# Altium PCB FMC_Test_Module.PcbDoc (part 1 of 2)
Units mm, origin at the board's own origin, x right, y up, seen from the top; angles counter-clockwise.
Board outline 34.9 x 69 mm, 4 copper layers (Top Layer, Int1 (GND), Int2 (PWR), Bottom Layer), stack 1.508 mm thick; 11 components, 88 nets, 527 pads, 220 vias.
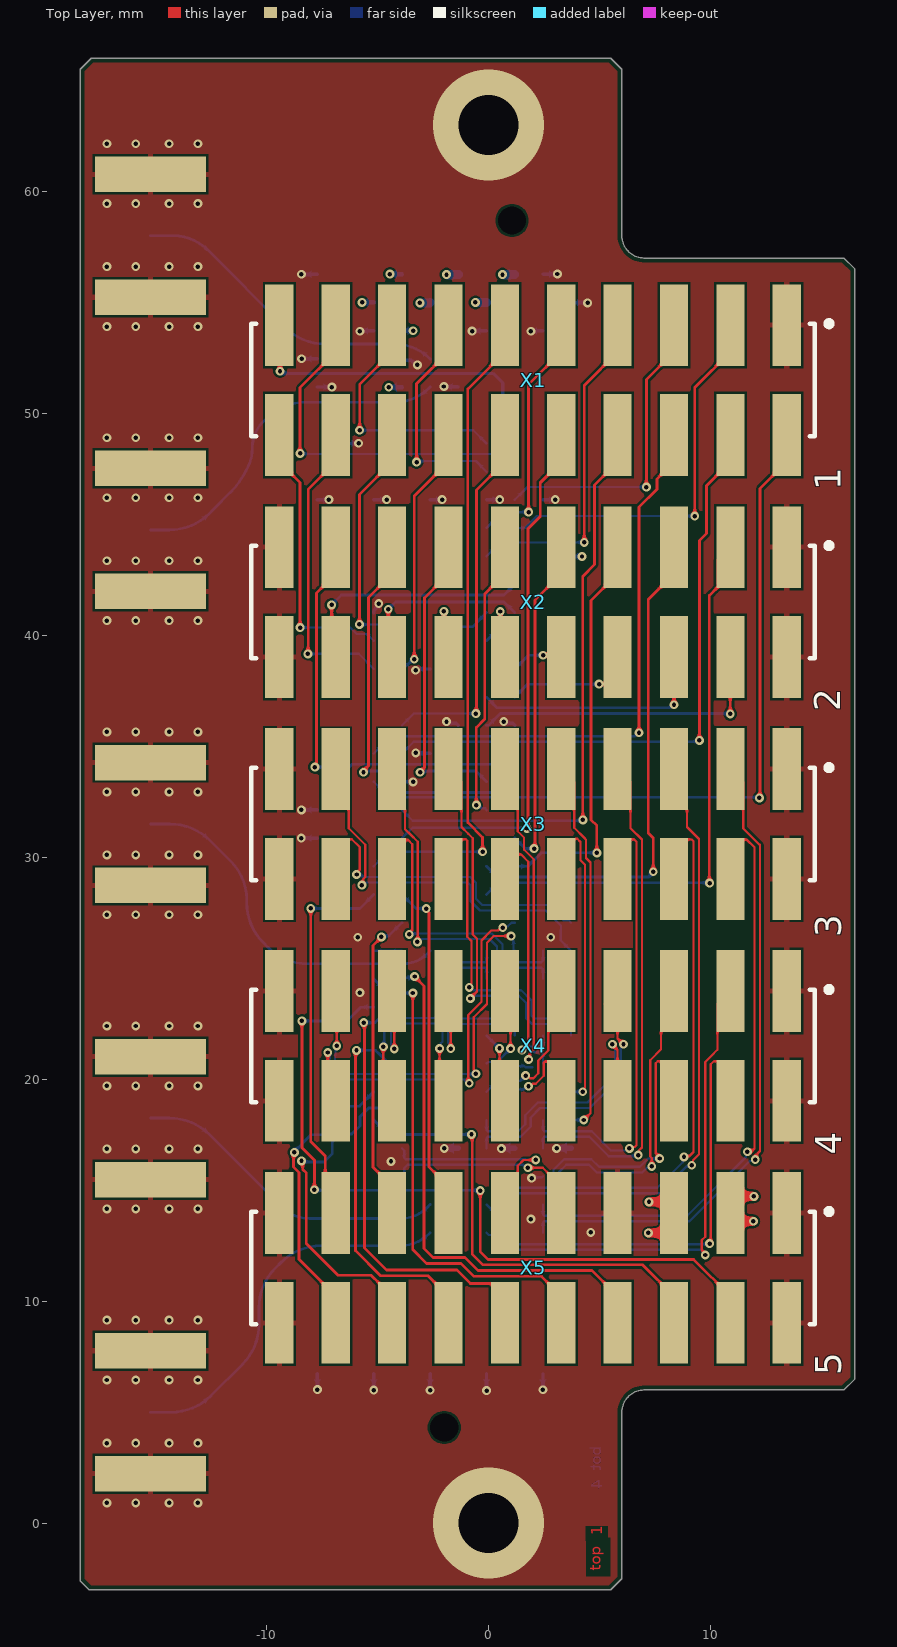
[diagram p0: Top Layer view]
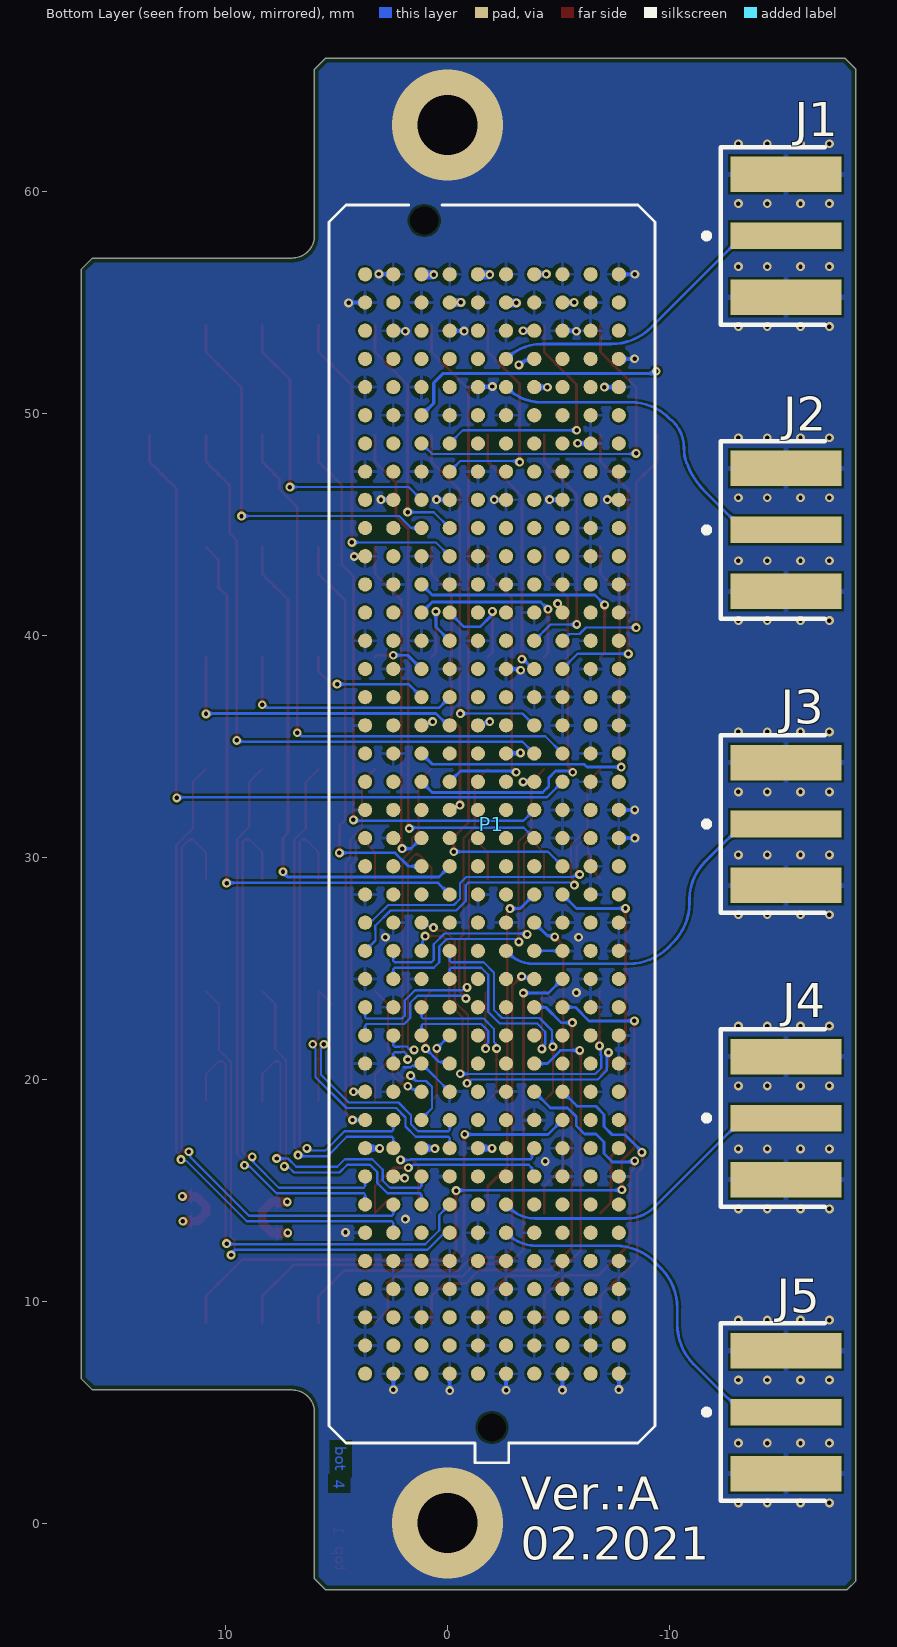
[diagram p1: Bottom Layer view, seen from below]
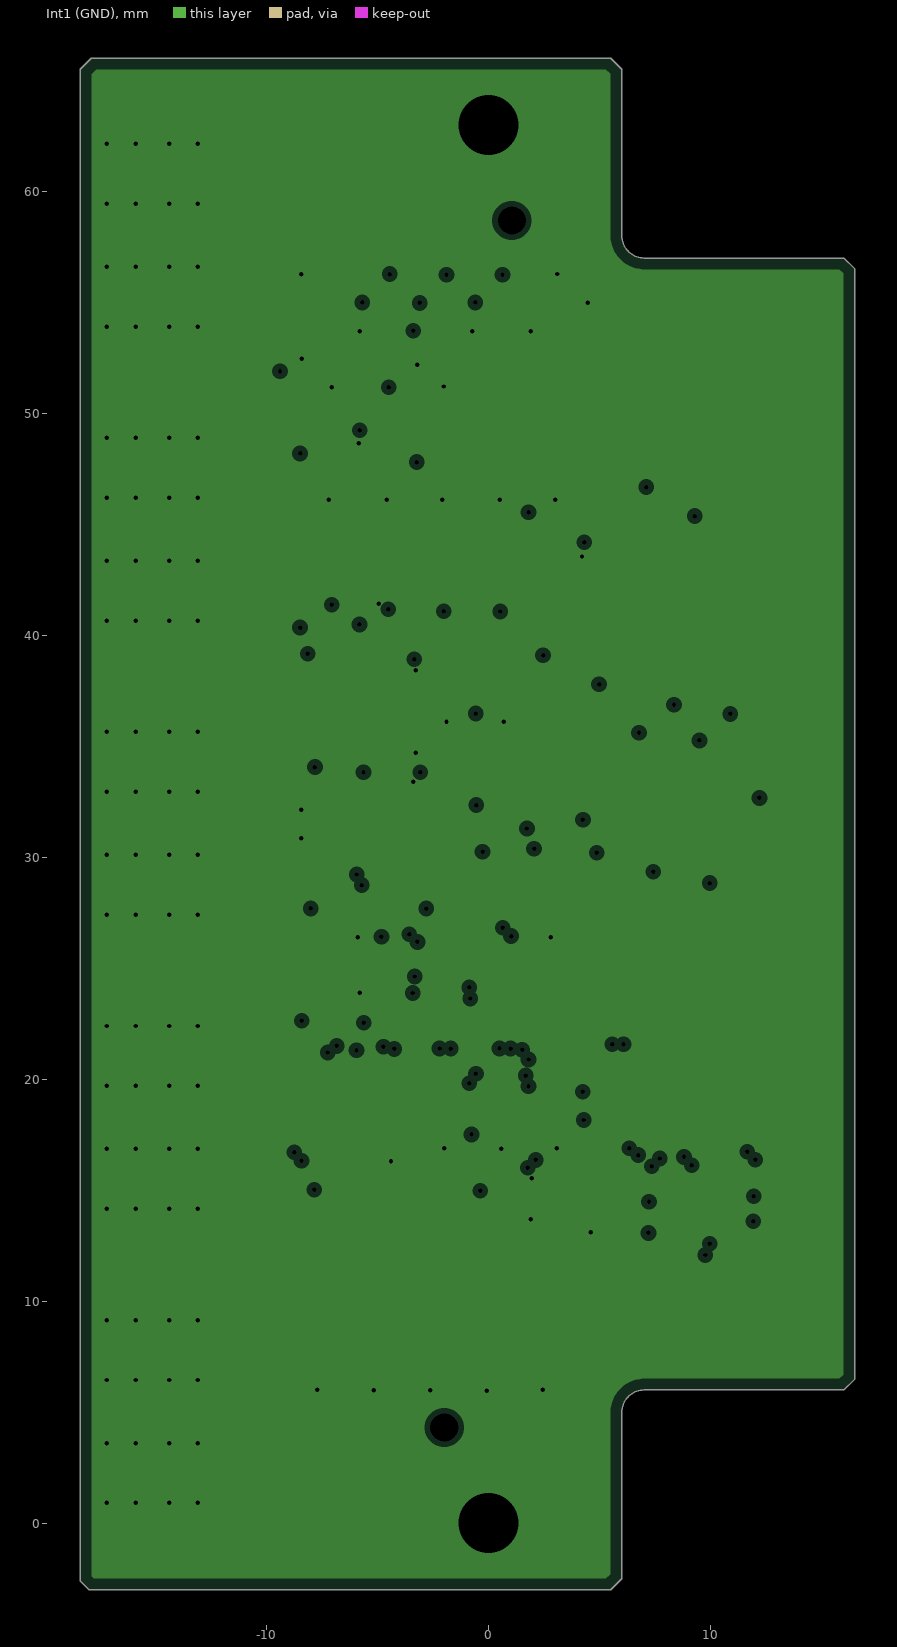
[diagram p2: Int1 (GND), clearances drawn from the general rule]
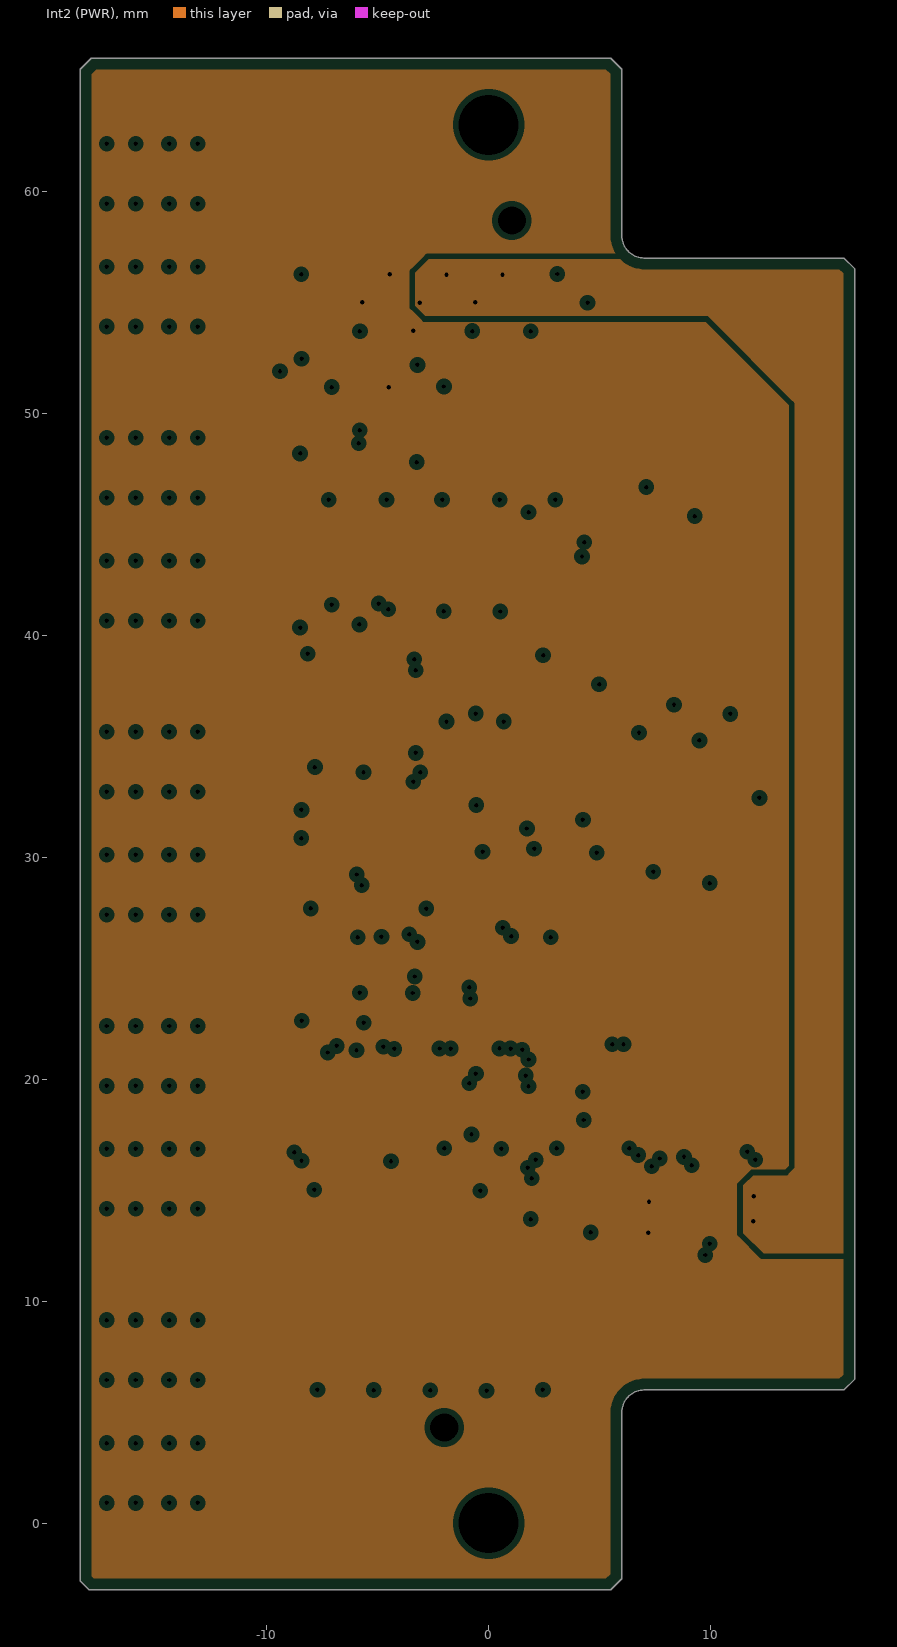
[diagram p3: Int2 (PWR), clearances drawn from the general rule]
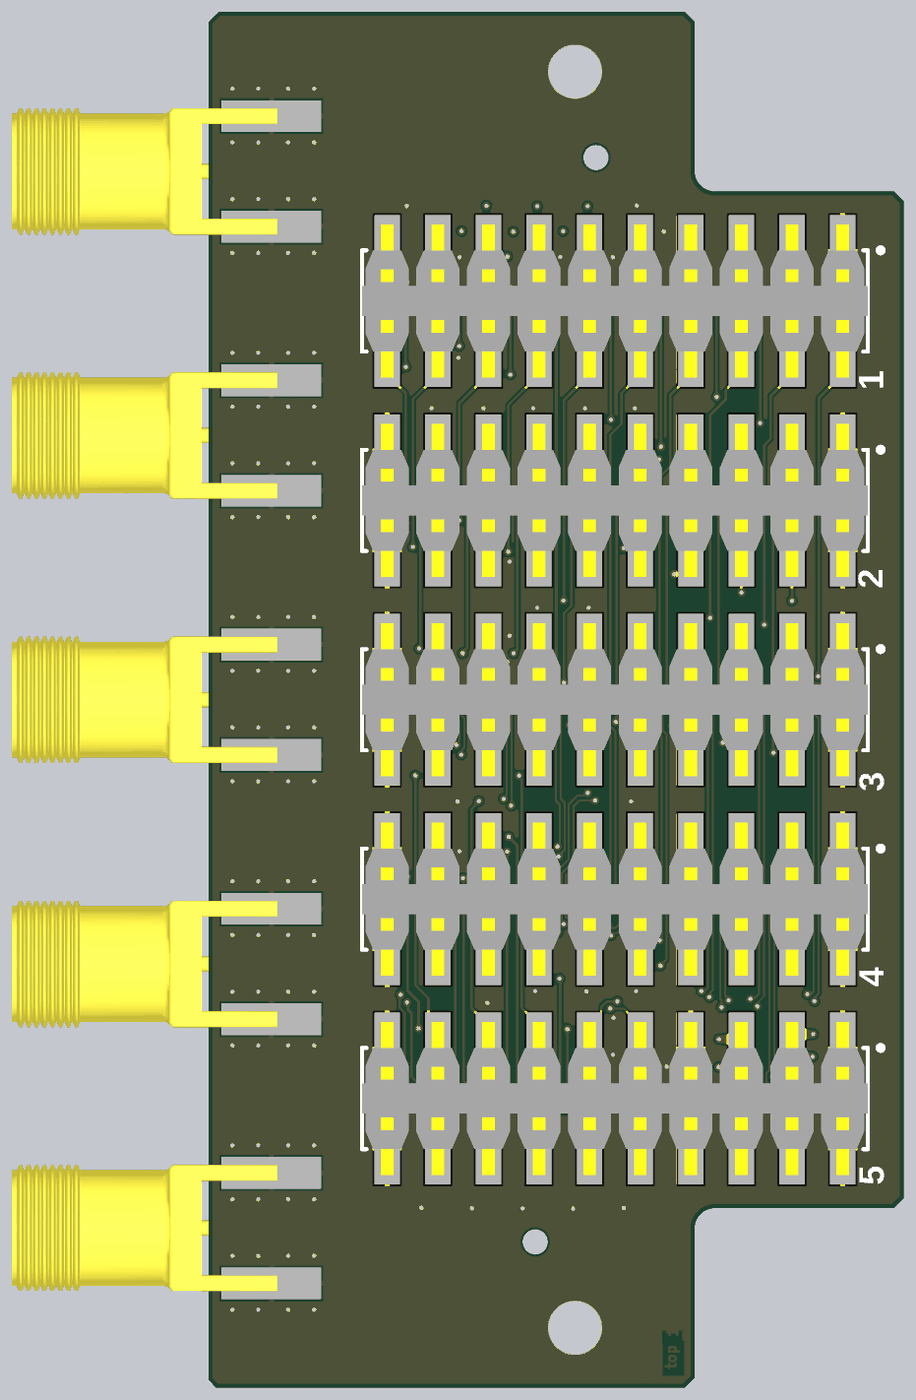
[diagram p5: 3D render of the assembled board from above, using the file's embedded part models]
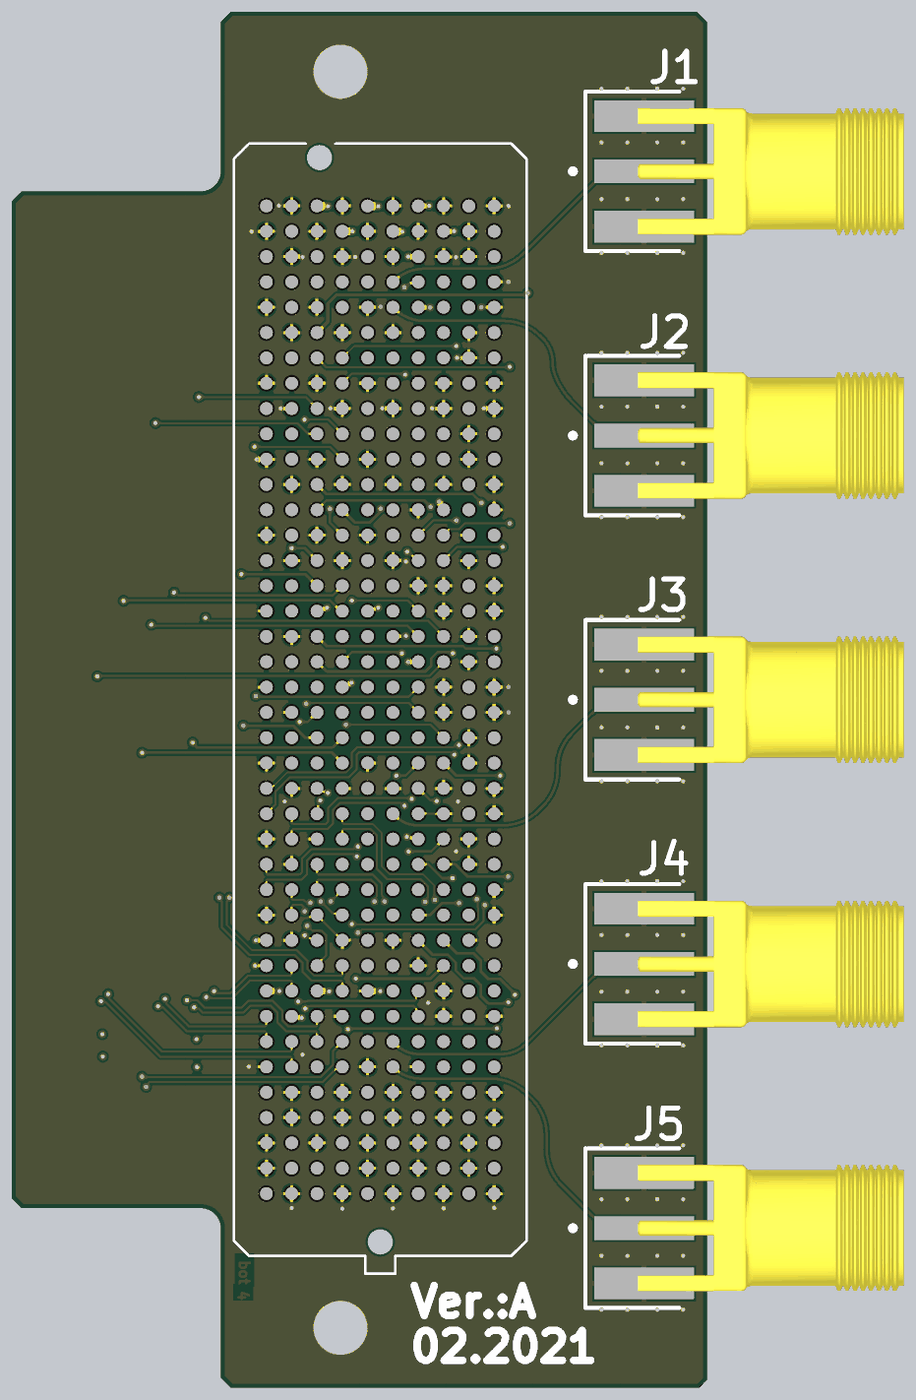
[diagram p6: 3D render of the assembled board from below, using the file's embedded part models]

## Layer stack, top to bottom
Top Solder: solder mask 0.0254, SM-001, Dk 4
Top Layer: signal copper 0.035
Dielectric 2: prepreg 0.0838, PP-009, Dk 4
Int1 (GND): plane copper 0.035, net GND
Dielectric 3: core 1.2, Core-043, Dk 4.3
Int2 (PWR): plane copper 0.035, net (Multiple Nets)
Dielectric 4: prepreg 0.0838, PP-009, Dk 4
Bottom Layer: signal copper 0.035
Bottom Solder: solder mask 0.0254, SM-001, Dk 4

## Board outline
-18.4,-2.6 -18.4,65.5 -17.9,66 5.5,66 6,65.5 6,58 ccw(c7,58) 7,57 16,57 16.5,56.5 16.5,6.5 16,6 7,6 ccw(c7,5) 6,5 6,-2.5 5.5,-3 -18,-3

## Design rules (kind name [scope] priority, off if disabled: settings)
BoardOutlineClearance [All] p1: gap=0.2 ignorepadtopadclearanceinfootprint=FALSE
Clearance [All] p1: gap=0.1 ignorepadtopadclearanceinfootprint=FALSE
DiffPairsRouting DiffPairsRouting_Hyper [InDifferentialPair('HYPER_CK')] p1: maxlimit=0.15 minlimit=0.15 mostfreqgap=0.15 toplayer_minwidth=0.1 toplayer_maxwidth=0.1 toplayer_prefwidth=0.1 bottomlayer_minwidth=0.1 bottomlayer_maxwidth=0.1 bottomlayer_prefwidth=0.1 impedanceprofiledriven=TRUE impedanceprofileid={B9DEDC51-EA28-49EF-AFAD-D0C3E7C7F371} impedanceprofilevalue=100.000000 maxuncoupledlength=12.7
DiffPairsRouting DiffPairsRouting_MPP_D [InDifferentialPairClass('All Differential Pairs')] p2: maxlimit=0.15 minlimit=0.15 mostfreqgap=0.15 toplayer_minwidth=0.1 toplayer_maxwidth=0.1 toplayer_prefwidth=0.1 bottomlayer_minwidth=0.1 bottomlayer_maxwidth=0.1 bottomlayer_prefwidth=0.1 impedanceprofiledriven=TRUE impedanceprofileid={B9DEDC51-EA28-49EF-AFAD-D0C3E7C7F371} impedanceprofilevalue=100.000000 maxuncoupledlength=12.7
DiffPairsRouting [InDifferentialPair('No Differential Pair')] p3: maxlimit=0.15 minlimit=0.15 mostfreqgap=0.15 toplayer_minwidth=0.1 toplayer_maxwidth=0.1 toplayer_prefwidth=0.1 bottomlayer_minwidth=0.1 bottomlayer_maxwidth=0.1 bottomlayer_prefwidth=0.1 impedanceprofiledriven=TRUE impedanceprofileid={B9DEDC51-EA28-49EF-AFAD-D0C3E7C7F371} impedanceprofilevalue=100.000000 maxuncoupledlength=12.7
HoleSize [All] p1: absolutevalues=TRUE maxlimit=4 minlimit=0.025 maxpercent=80.000 minpercent=20.000
MinimumSolderMaskSliver [All] p1: minsoldermaskwidth=0.1
PlaneClearance [All] p1: clearance=0.254
PlaneConnect [All] p1: pad.planeconnectstyle=Relief pad.reliefexpansion=0.125 pad.reliefentries=4 pad.reliefconductorwidth=0.125 pad.reliefairgap=0.125 via.planeconnectstyle=Direct via.reliefexpansion=0.508 via.reliefentries=4 via.reliefconductorwidth=0.254 via.reliefairgap=0.254
PolygonConnect PolygonConnect_GND_FMC [HasFootprint('BTB-SM1-27-2V400F')] p1: connectstyle=Relief reliefconductorwidth=0.15 reliefentries=4 polygonreliefangle="90 Angle" airgapwidth=0.2
PolygonConnect PolygonConnect_GND_FMC_1 [HasFootprint('BTB-SM1-27-2V400M')] p2: connectstyle=Relief reliefconductorwidth=0.15 reliefentries=4 polygonreliefangle="90 Angle" airgapwidth=0.2
PolygonConnect PolygonConnect_GND_FMC_2 [HasFootprint('FBGA24_A-130')] p3: connectstyle=Relief reliefconductorwidth=0.15 reliefentries=4 polygonreliefangle="90 Angle" airgapwidth=0.2
PolygonConnect PolygonConnect_GND [InNet('GND')] p4: thpad.connectstyle=Relief thpad.reliefconductorwidth=1 thpad.reliefentries=4 thpad.polygonreliefangle="90 Angle" thpad.airgapwidth=0.1 smdpad.connectstyle=Relief smdpad.reliefconductorwidth=0.254 smdpad.reliefentries=4 smdpad.polygonreliefangle="90 Angle" smdpad.airgapwidth=0.1 via.connectstyle=Direct via.reliefconductorwidth=0.254 via.reliefentries=4 via.polygonreliefangle="90 Angle" via.airgapwidth=0.254
PolygonConnect [All] p5: connectstyle=Relief reliefconductorwidth=0.254 reliefentries=4 polygonreliefangle="90 Angle" airgapwidth=0.254
RoutingVias [All] p1: holewidth=0.2 width=0.4 viastyle="Through Hole" minholewidth=0.2 minwidth=0.4 maxholewidth=3 maxwidth=6
SilkToSilkClearance [All] p1: silktosilkclearance=0.15
SilkToSolderMaskClearance [IsPad] p1: minsilkscreentomaskgap=0 clearancetoexposedcopper=TRUE
SolderMaskExpansion [All] p1: expansion=0.102 istentingtop=FALSE
Width Width_50R_CON1 [InNetClass('S_FMC_MPP_CON1')] p1: maxlimit=0.125 minlimit=0.125 preferedwidth=0.125 impedanceprofiledriven=TRUE impedanceprofileid={FCD363CF-F7B2-4878-A8FD-48319899D079} impedanceprofilevalue=50.000000 minimp=50.000000 maximp=50.000000 favimp=50.000000
Width Width_50R_CON2 [InNetClass('S_FMC_MPP_CON2')] p2: maxlimit=0.125 minlimit=0.125 preferedwidth=0.125 impedanceprofiledriven=TRUE impedanceprofileid={FCD363CF-F7B2-4878-A8FD-48319899D079} impedanceprofilevalue=50.000000 minimp=50.000000 maximp=50.000000 favimp=50.000000
Width [All] p3: maxlimit=5 minlimit=0.1 preferedwidth=0.15
23 further rules are at their usual default settings.

## Classes and differential pairs
component class FMC: P1
net class DP_FMC_MPP_CON2: CON2_GP_D_N0 CON2_GP_D_N1 CON2_GP_D_N2 CON2_GP_D_N3 CON2_GP_D_N4 CON2_GP_D_N5 CON2_GP_D_N6 CON2_GP_D_N7 CON2_GP_D_P0 CON2_GP_D_P1 CON2_GP_D_P2 CON2_GP_D_P3 CON2_GP_D_P4 CON2_GP_D_P5 CON2_GP_D_P6 CON2_GP_D_P7
net class DP_FMC_MPP_CON1: CON1_GP_D_N0 CON1_GP_D_N1 CON1_GP_D_N2 CON1_GP_D_N3 CON1_GP_D_N4 CON1_GP_D_N5 CON1_GP_D_N6 CON1_GP_D_N7 CON1_GP_D_P0 CON1_GP_D_P1 CON1_GP_D_P2 CON1_GP_D_P3 CON1_GP_D_P4 CON1_GP_D_P5 CON1_GP_D_P6 CON1_GP_D_P7
net class DIFFPAIR_Hyper: HYPER_CK_N HYPER_CK_P
net class S_FMC_MPP_CON2: CON2_GP_S0 CON2_GP_S1 CON2_GP_S2 CON2_GP_S3 CON2_GP_S4 CON2_GP_S5 CON2_GP_S6 CON2_GP_S7
net class S_FMC_MPP_CON1: CON1_GP_S0 CON1_GP_S1 CON1_GP_S2 CON1_GP_S3 CON1_GP_S4 CON1_GP_S5 CON1_GP_S6 CON1_GP_S7
net class CON2_GP_D_P[0..7]: CON2_GP_D_P0 CON2_GP_D_P1 CON2_GP_D_P2 CON2_GP_D_P3 CON2_GP_D_P4 CON2_GP_D_P5 CON2_GP_D_P6 CON2_GP_D_P7
net class CON2_GP_D_N[0..7]: CON2_GP_D_N0 CON2_GP_D_N1 CON2_GP_D_N2 CON2_GP_D_N3 CON2_GP_D_N4 CON2_GP_D_N5 CON2_GP_D_N6 CON2_GP_D_N7
net class CON1_GP_D_P[0..7]: CON1_GP_D_P0 CON1_GP_D_P1 CON1_GP_D_P2 CON1_GP_D_P3 CON1_GP_D_P4 CON1_GP_D_P5 CON1_GP_D_P6 CON1_GP_D_P7
net class CON1_GP_D_N[0..7]: CON1_GP_D_N0 CON1_GP_D_N1 CON1_GP_D_N2 CON1_GP_D_N3 CON1_GP_D_N4 CON1_GP_D_N5 CON1_GP_D_N6 CON1_GP_D_N7
net class CON2_GP_S[0..7]: CON2_GP_S0 CON2_GP_S1 CON2_GP_S2 CON2_GP_S3 CON2_GP_S4 CON2_GP_S5 CON2_GP_S6 CON2_GP_S7
net class CON1_GP_S[0..7]: CON1_GP_S0 CON1_GP_S1 CON1_GP_S2 CON1_GP_S3 CON1_GP_S4 CON1_GP_S5 CON1_GP_S6 CON1_GP_S7
net class QSPI_IO[0..3]: QSPI_IO0 QSPI_IO1 QSPI_IO2 QSPI_IO3
net class HYPER_D[0..7]: HYPER_D0 HYPER_D1 HYPER_D2 HYPER_D3 HYPER_D4 HYPER_D5 HYPER_D6 HYPER_D7
net class HYPER_CSN[0..1]: HYPER_CSN0 HYPER_CSN1
component class TEST: J1 J2 J3 J4 J5 X1 X2 X3 X4 X5
differential pair CON2_GP_D7: +CON2_GP_D_P7 -CON2_GP_D_N7
differential pair CON2_GP_D6: +CON2_GP_D_P6 -CON2_GP_D_N6
differential pair CON2_GP_D5: +CON2_GP_D_P5 -CON2_GP_D_N5
differential pair CON2_GP_D4: +CON2_GP_D_P4 -CON2_GP_D_N4
differential pair CON2_GP_D3: +CON2_GP_D_P3 -CON2_GP_D_N3
differential pair CON2_GP_D2: +CON2_GP_D_P2 -CON2_GP_D_N2
differential pair CON2_GP_D1: +CON2_GP_D_P1 -CON2_GP_D_N1
differential pair CON2_GP_D0: +CON2_GP_D_P0 -CON2_GP_D_N0
differential pair CON1_GP_D7: +CON1_GP_D_P7 -CON1_GP_D_N7
differential pair CON1_GP_D6: +CON1_GP_D_P6 -CON1_GP_D_N6
differential pair CON1_GP_D5: +CON1_GP_D_P5 -CON1_GP_D_N5
differential pair CON1_GP_D4: +CON1_GP_D_P4 -CON1_GP_D_N4
differential pair CON1_GP_D3: +CON1_GP_D_P3 -CON1_GP_D_N3
differential pair CON1_GP_D2: +CON1_GP_D_P2 -CON1_GP_D_N2
differential pair CON1_GP_D1: +CON1_GP_D_P1 -CON1_GP_D_N1
differential pair CON1_GP_D0: +CON1_GP_D_P0 -CON1_GP_D_N0
differential pair HYPER_CK: +HYPER_CK_P -HYPER_CK_N

## Components (designator, comment, footprint, x,y, rotation, side; value= is the part's Value field where it differs from the comment)
J1 "CON-SMA-EDGE-S" FP-CON-SMA-EDGE-S-MFG -22.5,58 r270 bottom locked
J2 "CON-SMA-EDGE-S" FP-CON-SMA-EDGE-S-MFG -22.5,44.75 r270 bottom locked
J3 "CON-SMA-EDGE-S" FP-CON-SMA-EDGE-S-MFG -22.5,31.5 r270 bottom locked
J4 "CON-SMA-EDGE-S" FP-CON-SMA-EDGE-S-MFG -22.5,18.25 r270 bottom locked
J5 "CON-SMA-EDGE-S" FP-CON-SMA-EDGE-S-MFG -22.5,5 r270 bottom locked
P1 "ASP-134488-01" BTB-SM1-27-2V400M -2,31.5 r270 bottom locked
X1 "TSM-110-01-L-DV" SMTC-TSM-110-01-X-DV 2,51.5 r180 top locked
X2 "TSM-110-01-L-DV" SMTC-TSM-110-01-X-DV 2,41.5 r180 top locked
X3 "TSM-110-01-L-DV" SMTC-TSM-110-01-X-DV 2,31.5 r180 top locked
X4 "TSM-110-01-L-DV" SMTC-TSM-110-01-X-DV 2,21.5 r180 top locked
X5 "TSM-110-01-L-DV" SMTC-TSM-110-01-X-DV 2,11.5 r180 top locked

## Footprints (in the part's own frame and the unit in brackets; to place one, negate y for a bottom-side part, rotate by r counter-clockwise, add the part's x,y. Pads: shape width x height; smd on the part's side, far side on the other; paste and mask are expansions set on the pad)
BTB-SM1-27-2V400M [mm] "Board-to-Board Connector, Vertical, 10-Row, Pitch 1.27mm, 400-Position"
  round 0.64 smd: A1(24.765,5.715) A2(23.495,5.715) A3(22.225,5.715) A4(20.955,5.715) A5(19.685,5.715) A6(18.415,5.715) A7(17.145,5.715) A8(15.875,5.715) A9(14.605,5.715) A10(13.335,5.715) A11(12.065,5.715) A12(10.795,5.715) A13(9.525,5.715) A14(8.255,5.715) A15(6.985,5.715) A16(5.715,5.715) A17(4.445,5.715) A18(3.175,5.715) A19(1.905,5.715) A20(0.635,5.715) A21(-0.635,5.715) A22(-1.905,5.715) A23(-3.175,5.715) A24(-4.445,5.715) A25(-5.715,5.715) A26(-6.985,5.715) A27(-8.255,5.715) A28(-9.525,5.715) A29(-10.795,5.715) A30(-12.065,5.715) A31(-13.335,5.715) A32(-14.605,5.715) A33(-15.875,5.715) A34(-17.145,5.715) A35(-18.415,5.715) A36(-19.685,5.715) A37(-20.955,5.715) A38(-22.225,5.715) A39(-23.495,5.715) A40(-24.765,5.715) B1(24.765,4.445) B2(23.495,4.445) B3(22.225,4.445) B4(20.955,4.445) B5(19.685,4.445) B6(18.415,4.445) B7(17.145,4.445) B8(15.875,4.445) B9(14.605,4.445) B10(13.335,4.445) B11(12.065,4.445) B12(10.795,4.445) B13(9.525,4.445) B14(8.255,4.445) B15(6.985,4.445) B16(5.715,4.445) B17(4.445,4.445) B18(3.175,4.445) B19(1.905,4.445) B20(0.635,4.445) B21(-0.635,4.445) B22(-1.905,4.445) B23(-3.175,4.445) B24(-4.445,4.445) B25(-5.715,4.445) B26(-6.985,4.445) B27(-8.255,4.445) B28(-9.525,4.445) B29(-10.795,4.445) B30(-12.065,4.445) B31(-13.335,4.445) B32(-14.605,4.445) B33(-15.875,4.445) B34(-17.145,4.445) B35(-18.415,4.445) B36(-19.685,4.445) B37(-20.955,4.445) B38(-22.225,4.445) B39(-23.495,4.445) B40(-24.765,4.445) C1(24.765,3.175) C2(23.495,3.175) C3(22.225,3.175) C4(20.955,3.175) C5(19.685,3.175) C6(18.415,3.175) C7(17.145,3.175) C8(15.875,3.175) C9(14.605,3.175) C10(13.335,3.175) C11(12.065,3.175) C12(10.795,3.175) C13(9.525,3.175) C14(8.255,3.175) C15(6.985,3.175) C16(5.715,3.175) C17(4.445,3.175) C18(3.175,3.175) C19(1.905,3.175) C20(0.635,3.175) C21(-0.635,3.175) C22(-1.905,3.175) C23(-3.175,3.175) C24(-4.445,3.175) C25(-5.715,3.175) C26(-6.985,3.175) C27(-8.255,3.175) C28(-9.525,3.175) C29(-10.795,3.175) C30(-12.065,3.175) C31(-13.335,3.175) C32(-14.605,3.175) C33(-15.875,3.175) C34(-17.145,3.175) C35(-18.415,3.175) C36(-19.685,3.175) C37(-20.955,3.175) C38(-22.225,3.175) C39(-23.495,3.175) C40(-24.765,3.175) D1(24.765,1.905) D2(23.495,1.905) D3(22.225,1.905) D4(20.955,1.905) D5(19.685,1.905) D6(18.415,1.905) D7(17.145,1.905) D8(15.875,1.905) D9(14.605,1.905) D10(13.335,1.905) D11(12.065,1.905) D12(10.795,1.905) D13(9.525,1.905) D14(8.255,1.905) D15(6.985,1.905) D16(5.715,1.905) D17(4.445,1.905) D18(3.175,1.905) D19(1.905,1.905) D20(0.635,1.905) D21(-0.635,1.905) D22(-1.905,1.905) D23(-3.175,1.905) D24(-4.445,1.905) D25(-5.715,1.905) D26(-6.985,1.905) D27(-8.255,1.905) D28(-9.525,1.905) D29(-10.795,1.905) D30(-12.065,1.905) D31(-13.335,1.905) D32(-14.605,1.905) D33(-15.875,1.905) D34(-17.145,1.905) D35(-18.415,1.905) D36(-19.685,1.905) D37(-20.955,1.905) D38(-22.225,1.905) D39(-23.495,1.905) D40(-24.765,1.905) E1(24.765,0.635) E2(23.495,0.635) E3(22.225,0.635) E4(20.955,0.635) E5(19.685,0.635) E6(18.415,0.635) E7(17.145,0.635) E8(15.875,0.635) E9(14.605,0.635) E10(13.335,0.635) E11(12.065,0.635) E12(10.795,0.635) E13(9.525,0.635) E14(8.255,0.635) E15(6.985,0.635) E16(5.715,0.635) E17(4.445,0.635) E18(3.175,0.635) E19(1.905,0.635) E20(0.635,0.635) E21(-0.635,0.635) E22(-1.905,0.635) E23(-3.175,0.635) E24(-4.445,0.635) E25(-5.715,0.635) E26(-6.985,0.635) E27(-8.255,0.635) E28(-9.525,0.635) E29(-10.795,0.635) E30(-12.065,0.635) E31(-13.335,0.635) E32(-14.605,0.635) E33(-15.875,0.635) E34(-17.145,0.635) E35(-18.415,0.635) E36(-19.685,0.635) E37(-20.955,0.635) E38(-22.225,0.635) E39(-23.495,0.635) E40(-24.765,0.635) F1(24.765,-0.635) F2(23.495,-0.635) F3(22.225,-0.635) F4(20.955,-0.635) F5(19.685,-0.635) F6(18.415,-0.635) F7(17.145,-0.635) F8(15.875,-0.635) F9(14.605,-0.635) F10(13.335,-0.635) F11(12.065,-0.635) F12(10.795,-0.635) F13(9.525,-0.635) F14(8.255,-0.635) F15(6.985,-0.635) F16(5.715,-0.635) F17(4.445,-0.635) F18(3.175,-0.635) F19(1.905,-0.635) F20(0.635,-0.635) F21(-0.635,-0.635) F22(-1.905,-0.635) F23(-3.175,-0.635) F24(-4.445,-0.635) F25(-5.715,-0.635) F26(-6.985,-0.635) F27(-8.255,-0.635) F28(-9.525,-0.635) F29(-10.795,-0.635) F30(-12.065,-0.635) F31(-13.335,-0.635) F32(-14.605,-0.635) F33(-15.875,-0.635) F34(-17.145,-0.635) F35(-18.415,-0.635) F36(-19.685,-0.635) F37(-20.955,-0.635) F38(-22.225,-0.635) F39(-23.495,-0.635) F40(-24.765,-0.635) G1(24.765,-1.905) G2(23.495,-1.905) G3(22.225,-1.905) G4(20.955,-1.905) G5(19.685,-1.905) G6(18.415,-1.905) G7(17.145,-1.905) G8(15.875,-1.905) G9(14.605,-1.905) G10(13.335,-1.905) G11(12.065,-1.905) G12(10.795,-1.905) G13(9.525,-1.905) G14(8.255,-1.905) G15(6.985,-1.905) G16(5.715,-1.905) G17(4.445,-1.905) G18(3.175,-1.905) G19(1.905,-1.905) G20(0.635,-1.905) G21(-0.635,-1.905) G22(-1.905,-1.905) G23(-3.175,-1.905) G24(-4.445,-1.905) G25(-5.715,-1.905) G26(-6.985,-1.905) G27(-8.255,-1.905) G28(-9.525,-1.905) G29(-10.795,-1.905) G30(-12.065,-1.905) G31(-13.335,-1.905) G32(-14.605,-1.905) G33(-15.875,-1.905) G34(-17.145,-1.905) G35(-18.415,-1.905) G36(-19.685,-1.905) G37(-20.955,-1.905) G38(-22.225,-1.905) G39(-23.495,-1.905) G40(-24.765,-1.905) H1(24.765,-3.175) H2(23.495,-3.175) H3(22.225,-3.175) H4(20.955,-3.175) H5(19.685,-3.175) H6(18.415,-3.175) H7(17.145,-3.175) H8(15.875,-3.175) H9(14.605,-3.175) H10(13.335,-3.175) H11(12.065,-3.175) H12(10.795,-3.175) H13(9.525,-3.175) H14(8.255,-3.175) H15(6.985,-3.175) H16(5.715,-3.175) H17(4.445,-3.175) H18(3.175,-3.175) H19(1.905,-3.175) H20(0.635,-3.175) H21(-0.635,-3.175) H22(-1.905,-3.175) H23(-3.175,-3.175) H24(-4.445,-3.175) H25(-5.715,-3.175) H26(-6.985,-3.175) H27(-8.255,-3.175) H28(-9.525,-3.175) H29(-10.795,-3.175) H30(-12.065,-3.175) H31(-13.335,-3.175) H32(-14.605,-3.175) H33(-15.875,-3.175) H34(-17.145,-3.175) H35(-18.415,-3.175) H36(-19.685,-3.175) H37(-20.955,-3.175) H38(-22.225,-3.175) H39(-23.495,-3.175) H40(-24.765,-3.175) J1(24.765,-4.445) J2(23.495,-4.445) J3(22.225,-4.445) J4(20.955,-4.445) J5(19.685,-4.445) J6(18.415,-4.445) J7(17.145,-4.445) J8(15.875,-4.445) J9(14.605,-4.445) J10(13.335,-4.445) J11(12.065,-4.445) J12(10.795,-4.445) J13(9.525,-4.445) J14(8.255,-4.445) J15(6.985,-4.445) J16(5.715,-4.445) J17(4.445,-4.445) J18(3.175,-4.445) J19(1.905,-4.445) J20(0.635,-4.445) J21(-0.635,-4.445) J22(-1.905,-4.445) J23(-3.175,-4.445) J24(-4.445,-4.445) J25(-5.715,-4.445) J26(-6.985,-4.445) J27(-8.255,-4.445) J28(-9.525,-4.445) J29(-10.795,-4.445) J30(-12.065,-4.445) J31(-13.335,-4.445) J32(-14.605,-4.445) J33(-15.875,-4.445) J34(-17.145,-4.445) J35(-18.415,-4.445) J36(-19.685,-4.445) J37(-20.955,-4.445) J38(-22.225,-4.445) J39(-23.495,-4.445) J40(-24.765,-4.445) K1(24.765,-5.715) K2(23.495,-5.715) K3(22.225,-5.715) K4(20.955,-5.715) K5(19.685,-5.715) K6(18.415,-5.715) K7(17.145,-5.715) K8(15.875,-5.715) K9(14.605,-5.715) K10(13.335,-5.715) K11(12.065,-5.715) K12(10.795,-5.715) K13(9.525,-5.715) K14(8.255,-5.715) K15(6.985,-5.715) K16(5.715,-5.715) K17(4.445,-5.715) K18(3.175,-5.715) K19(1.905,-5.715) K20(0.635,-5.715) K21(-0.635,-5.715) K22(-1.905,-5.715) K23(-3.175,-5.715) K24(-4.445,-5.715) K25(-5.715,-5.715) K26(-6.985,-5.715) K27(-8.255,-5.715) K28(-9.525,-5.715) K29(-10.795,-5.715) K30(-12.065,-5.715) K31(-13.335,-5.715) K32(-14.605,-5.715) K33(-15.875,-5.715) K34(-17.145,-5.715) K35(-18.415,-5.715) K36(-19.685,-5.715) K37(-20.955,-5.715) K38(-22.225,-5.715) K39(-23.495,-5.715) K40(-24.765,-5.715)
  round 0.97 hole 1.27 unplated: MH1(-27.19,-3.05) MH2(27.19,0)
  silkscreen extent -27.89,-7.34 28.78,7.34, body extent -27.89,-7.34 28.78,7.34, height 7.21
FP-CON-SMA-EDGE-S-MFG [mm]
  rect 1.2x5 smd paste+0 mask+0: 1(0,-7.26)
  rect 1.6x5 smd paste+0 mask+0: 2(-2.77,-7.26) 3(2.77,-7.26)
  rect 1.6x5 smd far side paste+0 mask+0: 4(-2.77,-7.26) 5(2.77,-7.26)
  silkscreen extent -4,-10.96 4,-5.5, body extent -3.18,-7.57 3.18,5.76, height 3.55
SMTC-TSM-110-01-X-DV [mm] "Double Row Gullwing ASM, 2x10 Pins, Vertical, 2.54mm Pitch, Male"
  rect 1.27x3.68 smd: 1(-11.43,-2.475) 2(-11.43,2.475) 3(-8.89,-2.475) 4(-8.89,2.475) 5(-6.35,-2.475) 6(-6.35,2.475) 7(-3.81,-2.475) 8(-3.81,2.475) 9(-1.27,-2.475) 10(-1.27,2.475) 11(1.27,-2.475) 12(1.27,2.475) 13(3.81,-2.475) 14(3.81,2.475) 15(6.35,-2.475) 16(6.35,2.475) 17(8.89,-2.475) 18(8.89,2.475) 19(11.43,-2.475) 20(11.43,2.475)
  silkscreen extent -13.46,-2.66 12.7,2.54, body extent -12.7,-3.85 12.7,3.85, height 9.65

## Part data
J1 J2 J3 J4 J5: library part CMP-204357-000001-1, "CONN SMA JACK STR EDGE MNT", Frequency=18GHz, Manufacturer="RF Solutions Ltd.", Package=CONN_JACK, Automotive=No, Category=Conn, ComponentLink2Description=Datasheet, ComponentLink2URL=https://www.rfsolutions.co.uk/downloads/1498648656DS-CON-EDGE-SMA-4.pdf, Conn Orientation="Right Angle", Contact Material=Gold, Device Class L1=Connectors, Device Class L2="RF / Coaxial Connectors", Device Class L3=unset, Digikey Description="CONN SMA JACK STR EDGE MNT", Footprint Url=https://forum.upverter.com/uploads/default/original/3X/b/e/be75b907af57498775929d6d9099689c472e0307.pdf, Height=6.35mm, Impedance=50Ω, Is Female=yes, Lead Free=Yes, Manufacturer Part Number=CON-SMA-EDGE-S, Number of Contacts=1, Octopart=https://octopart.com/con-sma-edge-s-rf+solutions-70967450, RoHS=TRUE, Shielding=true
P1: library part CMP-0001-00022-1, "Board-to-Board Connector, Vertical, 10-Row, Pitch 1.27mm, 400-Position", Manufacturer=Samtec, Package Quantity=1, Package Reference=BTB-SM1-27-2V400M, Supplier Part Number 1=SAM8730-ND, Category=Connectors, ClassName="Board Template Connector", ComponentLink1Description=https://datasheet.ciiva.com/403/asp-134488-01-403749.pdf?src-supplier=Digi-Key, ComponentLink1URL=https://datasheet.ciiva.com/403/asp-134488-01-403749.pdf?src-supplier=Digi-Key, ComponentLink2Description=https://datasheet.ciiva.com/9532/asp-134488-01-9532666.pdf?src-supplier=Avnet, ComponentLink2URL=https://datasheet.ciiva.com/9532/asp-134488-01-9532666.pdf?src-supplier=Avnet, Contact Material="Copper Alloy", Contact Plating=Gold, Datasheet Version=Feb-2007, Gender=Male, Manufacturer Part Number=ASP-134488-01, Mating Connector=ASP-134486-01, Mount="Surface Mount", Number of Contacts=400, Number of Positions=400, Number of Rows=10, Packaging="Tape and Reel", PartId=1, Pitch=0.05inch, Pricing 1="1=27.73000, 10=25.03300, 25=23.98400, 50=22.48500, 100=21.73550, 250=20.53632, 500=19.93670, 1000=19.48700 (USD)", Publisher=Altium, Radiation Hardening=No, REACH SVHC="No SVHC", RoHS=Yes, RoHS Compliant=Yes, Series=ASP, Stock 1=4276, Supplier 1=Digi-Key, Termination=SMD/SMT
X1 X2 X3 X4 X5: library part CMP-1024-00285-1, "0.025\" SQ Post Header, Surface Mount, Vertical, -55 to 125 degC, 2.54 mm Pitch, 20-Pin, Male, RoHS", Color=Black, Current Rating=7A, Manufacturer=Samtec, Max Operating Temperature=125°C, Max Voltage Rating (AC)=475V, Min Operating Temperature=-55°C, Package Quantity=1, Supplier Part Number 1=SAM10819-ND, Temperature Range="-55 to 125 degC", Category="Headers and Wire Housings", ComponentLink1Description="Manufacturer URL", ComponentLink1URL=http://www.samtec.com, ComponentLink2Description=Datasheet, ComponentLink2URL=http://www.samtec.com/documents/webfiles/pdf/TSM.PDF, ComponentLink3Description="Package Specification", ComponentLink3URL=http://www.samtec.com/documents/webfiles/cpdf/TSM-1XX-XX-XXX-XX-X-XXX-X-MKT.pdf, ComponentLink4Description=https://datasheet.ciiva.com/25616/0900766b81157e6c-25616960.pdf?src-supplier=RSComponents, ComponentLink4URL=https://datasheet.ciiva.com/25616/0900766b81157e6c-25616960.pdf?src-supplier=RSComponents, ComponentLink5Description=https://datasheet.ciiva.com/22677/1847330-22677900.pdf?src-supplier=Element14, ComponentLink5URL=https://datasheet.ciiva.com/22677/1847330-22677900.pdf?src-supplier=Element14, ComponentLink6Description=https://datasheet.ciiva.com/737/tsm-1xx-xx-xxx-xx-x-xxx-x-mkt-737871.pdf?src-supplier=Digi-Key, ComponentLink6URL=https://datasheet.ciiva.com/737/tsm-1xx-xx-xxx-xx-x-xxx-x-mkt-737871.pdf?src-supplier=Digi-Key, Connector Type="Male Pin", Contact Material=Bronze, Contact Mating Length=0.23inch, Contact Plating=Gold, DatasheetVersion=F-214, Depth=5.08mm, Gender=Male, Housing Color=Black, Housing Material=Polymer, Lead Free="Lead Free", Length=25.4mm, Manufacturer Part Number=TSM-110-01-L-DV, Max Current Rating=7A, Mounting Technology="Surface Mount", Number of Contacts=20, Number of Positions=20, Number of Rows=2, Orientation=Vertical, PackageDescription="Double Row Gullwing ASM", PackageReference=TSM-110-01-X-DV, PackageVersion="DJ, 4/1991", Packaging=Bulk, PartNumber=TSM-110-01-L-DV, Pitch="2.54 mm", Pricing 1="1=2.18000, 10=1.97700, 100=1.69470, 500=1.41226, 1000=1.21050, 5000=1.07331, 10000=1.04910 (USD)", Radiation Hardening=No, REACH SVHC="No SVHC", RoHS=True, Row Spacing=0.1inch, Stock 1=159, Supplier 1=Digi-Key, Termination=Solder, Voltage Rating=475V

## Via types
v1: diameter 0.4, hole 0.2, Top Layer to Bottom Layer, tented both sides, 218 vias
v2: diameter 5, hole 2.7, Top Layer to Bottom Layer, 2 vias

## Nets (pads, with @x,y where several pads share a name; then routed paths per layer and width w, separated by ;. In a path a pad name is that pad's centre, name@x,y a point inside that pad or via, vN(x,y) a via of type N, cw(c..) or ccw(c..) an arc to the next point about the centre after c; other vN are vias at no path point)
CON1_GP_D_N0: P1.G7 X4.4 | length 21.8
  Top Layer w0.1: v1@10.03,12.518 v1(9.955,12.593) 9.982,12.593 10.006,12.617 10.006,20.673 10.148,20.815 10.305,20.815 10.89,20.23 X4.4@10.89,19.025
  Bottom Layer w0.1: P1.G7@-0.095,14.355 0.375,13.885 0.375,13.2 1.007,12.568 9.93,12.568 v1(9.955,12.593)
CON1_GP_D_N1: P1.H8 X4.6 | length 14.8
  Top Layer w0.1: v1(7.704,16.429) 7.704,16.51 7.527,16.686 7.527,18.46 7.527,20.721 7.621,20.815 7.765,20.815 8.35,20.23 X4.6@8.35,19.025
  Bottom Layer w0.1: P1.H8@1.175,15.625 1.175,15.174 1.234,15.115 2.6,15.115 2.918,15.433 2.918,15.922 3.396,16.4 4.627,16.4 4.974,16.053 6.814,16.053 7.19,16.429 v1(7.704,16.429)
CON1_GP_D_N2: P1.G10 X4.8 | length 11.6
  Top Layer w0.1: v1(5.575,21.575) 5.575,21.55 5.81,21.315 X4.8@5.81,19.025
  Bottom Layer w0.1: P1.G10@-0.095,18.165 -0.095,17.714 -0.036,17.655 1.33,17.655 1.645,17.97 1.645,18.383 2.212,18.95 4.45,18.95 5.7,20.2 5.7,21.375 5.575,21.5 v1(5.575,21.575)
CON1_GP_D_N3: P1.H11 X4.10 | length 4.4
  Top Layer w0.1: v1(1.797,19.682) 1.878,19.682 1.991,19.796 2.12,19.796 2.485,20.161 2.485,20.741 2.544,20.8 2.685,20.8 3.27,20.215 X4.10@3.27,19.025
  Bottom Layer w0.1: P1.H11@1.175,19.435 1.278,19.538 1.572,19.538 1.715,19.682 v1(1.797,19.682)
CON1_GP_D_N4: P1.G13 X4.12 | length 3.3
  Top Layer w0.1: v1(0.488,21.388) 0.488,19.267 X4.12@0.73,19.025
  Bottom Layer w0.1: P1.G13@-0.095,21.975 -0.095,21.973 v1(0.488,21.388) v1(0.488,21.388)
CON1_GP_D_N5: P1.H14 X4.14 | length 7.4
  Top Layer w0.1: v1(-2.21,21.385) -2.21,19.425 X4.14@-1.81,19.025
  Bottom Layer w0.1: v1(-2.21,21.385) -2.155,21.44 -2.155,21.625 -2.085,21.694 -2.085,22.273 -1.623,22.735 1.116,22.735 1.175,22.794 P1.H14@1.175,23.245
CON1_GP_D_N6: P1.G16 X4.16 | length 10.7
  Top Layer w0.1: v1(-4.741,21.464) -4.751,21.455 -4.751,19.426 X4.16@-4.35,19.025
  Bottom Layer w0.1: v1(-4.741,21.464) -4.705,21.5 -4.705,22.193 -4.139,22.76 -2.456,22.76 -2.085,23.13 -2.085,24.813 -1.623,25.275 -0.154,25.275 -0.095,25.334 P1.G16@-0.095,25.785
CON1_GP_D_N7: P1.H17 X4.18 | length 17
  Top Layer w0.1: v1(-7.249,21.207) -7.249,20.589 X4.18@-6.89,20.23 ; v1(-0.875,19.82) -0.922,19.867 -0.922,22.897 -0.325,23.494 -0.325,26.254 0.123,26.702 0.426,26.702 0.554,26.83 v1(0.635,26.83)
  Bottom Layer w0.1: v1(-7.249,21.207) -7.233,21.207 -7.173,21.147 -7.173,20.398 -6.76,19.985 -1.084,19.985 -0.918,19.82 v1(-0.875,19.82) ; v1(0.635,26.83) 0.692,26.887 0.861,26.887 1.029,27.055 P1.H17@1.175,27.055
CON1_GP_D_P0: P1.G6 X4.3 | length 22.8
  Top Layer w0.1: v1(9.756,12.081) 9.756,12.158 9.605,12.309 9.605,12.755 9.756,12.906 9.756,20.777 10.044,21.065 10.305,21.326 10.305,23.39 X4.3@10.89,23.975
  Bottom Layer w0.1: P1.G6@-0.095,13.085 0.008,12.982 0.24,12.982 0.904,12.318 9.581,12.318 9.756,12.142 v1(9.756,12.081)
CON1_GP_D_P1: P1.H7 X4.5 | length 16.1
  Top Layer w0.1: v1(7.35,16.075) 7.35,16.451 7.277,16.523 7.277,18.564 7.277,20.824 7.28,20.827 7.28,20.862 7.765,21.347 7.765,23.39 X4.5@8.35,23.975
  Bottom Layer w0.1: P1.H7@1.175,14.355 1.175,14.806 1.234,14.865 2.703,14.865 3.168,15.33 3.168,15.818 3.5,16.15 4.524,16.15 4.871,15.803 6.918,15.803 7.133,16.018 7.293,16.018 v1(7.35,16.075)
CON1_GP_D_P2: P1.G9 X4.7 | length 12.7
  Top Layer w0.1: X4.7@5.225,23.39 X4.7@5.81,23.975 5.81,21.84 v1(6.075,21.575)
  Bottom Layer w0.1: P1.G9@-0.095,16.895 -0.095,17.346 -0.036,17.405 1.433,17.405 1.895,17.867 1.895,18.28 2.315,18.7 4.554,18.7 5.95,20.096 5.95,21.375 6.075,21.5 v1(6.075,21.575)
CON1_GP_D_P3: P1.H10 X4.9 | length 7.7
  Top Layer w0.1: v1(1.666,20.167) 1.747,20.167 1.868,20.046 2.016,20.046 2.235,20.265 2.235,20.845 2.44,21.05 2.442,21.05 2.685,21.293 2.685,23.39 X4.9@3.27,23.975
  Bottom Layer w0.1: P1.H10@1.175,18.165 1.175,18.225 0.705,18.695 0.705,19.657 0.968,19.92 1.42,19.92 v1(1.666,20.167)
CON1_GP_D_P4: P1.G12 X4.11 | length 4.1
  Top Layer w0.1: X4.11@0.73,23.975 0.988,23.717 v1(0.988,21.384)
  Bottom Layer w0.1: P1.G12@-0.095,20.705 -0.02,20.78 0.384,20.78 v1(0.988,21.384)
CON1_GP_D_P5: P1.H13 X4.13 | length 7.1
  Top Layer w0.1: X4.13@-1.81,23.975 -1.71,23.875 v1(-1.71,21.381)
  Bottom Layer w0.1: v1(-1.71,21.381) -1.767,21.438 -1.767,21.578 -1.835,21.645 -1.835,22.17 -1.52,22.485 1.116,22.485 1.175,22.426 P1.H13@1.175,21.975
CON1_GP_D_P6: P1.G15 X4.15 | length 11.3
  Top Layer w0.1: X4.15@-4.935,23.39 X4.15@-4.35,23.975 -4.251,23.876 v1(-4.251,21.366)
  Bottom Layer w0.1: v1(-4.251,21.366) -4.251,21.447 -4.404,21.6 -4.404,22.141 -4.035,22.51 -2.352,22.51 -1.835,23.027 -1.835,24.71 -1.52,25.025 -0.154,25.025 -0.095,24.966 P1.G15@-0.095,24.515
CON1_GP_D_P7: P1.H16 X4.17 | length 18.1
  Top Layer w0.1: X4.17@-6.89,23.975 -6.845,23.93 v1(-6.845,21.501) ; v1(-0.572,20.249) -0.572,20.33 -0.672,20.43 -0.672,22.793 -0.075,23.39 -0.075,26.15 0.226,26.451 v1(1.009,26.451)
  Bottom Layer w0.1: v1(-6.845,21.501) -6.899,21.448 -6.899,21.081 -6.923,21.057 -6.923,20.502 -6.656,20.235 -0.586,20.235 v1(-0.572,20.249) ; v1(1.009,26.451) 1.009,26.37 1.124,26.255 1.124,25.836 P1.H16@1.175,25.785
CON1_GP_S0: P1.G24 X2.4 | length 13.8
  Top Layer w0.125: v1(10.885,36.46) 10.89,36.46 X2.4@10.89,39.025
  Bottom Layer w0.125: P1.G24@-0.095,35.945 -0.01,35.945 0.522,36.478 10.867,36.478 v1(10.885,36.46)
CON1_GP_S1: P1.G25 X2.6 | length 10.9
  Top Layer w0.125: v1(8.35,36.875) X2.6@8.35,39.025
  Bottom Layer w0.125: P1.G25@-0.095,37.215 0.387,36.732 8.133,36.732 8.276,36.875 v1(8.35,36.875)
CON1_GP_S2: P1.H25 X2.8 | length 5.8
  Top Layer w0.125: v1(4.975,37.8) 5.238,37.8 5.81,38.372 X2.8@5.81,39.025
  Bottom Layer w0.125: P1.H25@1.175,37.215 1.76,37.8 v1(4.975,37.8)
CON1_GP_S3: P1.H26 X2.10 | length 2.4
  Top Layer w0.125: v1(2.451,39.105) 3.19,39.105 X2.10@3.27,39.025
  Bottom Layer w0.125: P1.H26@1.175,38.485 1.795,39.105 v1(2.451,39.105)
CON1_GP_S4: P1.G27 X2.12 | length 3.7
  Top Layer w0.125: v1(0.525,41.075) 0.525,39.23 X2.12@0.73,39.025
  Bottom Layer w0.125: P1.G27@-0.095,39.755 0.525,40.375 v1(0.525,41.075)
CON1_GP_S5: P1.G28 X2.14 | length 4.7
  Top Layer w0.125: v1(-2.017,41.08) -2.017,39.232 X2.14@-1.81,39.025
  Bottom Layer w0.125: v1(-2.017,41.08) -1.965,41.028 -1.965,40.882 -1.467,40.384 -0.736,40.384 P1.G28@-0.095,41.025
CON1_GP_S6: P1.H28 X2.16 | length 8.3
  Top Layer w0.125: v1(-4.525,41.175) -4.525,39.2 X2.16@-4.35,39.025
  Bottom Layer w0.125: v1(-4.525,41.175) -4.193,41.507 0.692,41.507 P1.H28@1.175,41.025
CON1_GP_S7: P1.H29 X2.18 | length 11.1
  Top Layer w0.125: v1(-7.075,41.375) -7.075,39.21 X2.18@-6.89,39.025
  Bottom Layer w0.125: v1(-7.075,41.375) -6.638,41.812 0.692,41.812 P1.H29@1.175,42.295
CON2_GP_D_N0: P1.J7 X3.4 | length 27.6
  Top Layer w0.1: X3.4@10.89,29.025 10.89,30.22 11.475,30.805 11.616,30.805 11.975,30.447 11.975,16.875 11.786,16.686 11.703,16.686 v1(11.656,16.733)
  Bottom Layer w0.1: P1.J7@2.445,14.355 2.445,13.909 2.504,13.85 7.073,13.85 8.95,13.85 11.599,16.499 11.599,16.675 v1(11.656,16.733)
CON2_GP_D_N1: P1.K8 X3.6 | length 23.1
  Top Layer w0.1: X3.6@8.35,29.025 8.35,30.222 8.935,30.807 9.143,30.807 9.231,30.719 9.231,16.726 9.05,16.545 8.845,16.545 v1(8.8,16.5)
  Bottom Layer w0.1: P1.K8@3.715,15.625 3.715,15.174 3.774,15.115 7.601,15.115 8.745,16.26 8.745,16.445 v1(8.8,16.5)
CON2_GP_D_N2: P1.J10 X3.8 | length 21.1
  Top Layer w0.1: X3.8@5.81,29.025 5.81,30.223 6.395,30.808 6.544,30.808 6.658,30.695 6.658,17.033 6.567,16.942 6.397,16.942 v1(6.34,16.885)
  Bottom Layer w0.1: P1.J10@2.445,18.165 2.445,17.714 2.504,17.655 4.644,17.655 5.514,16.785 6.159,16.785 6.259,16.885 v1(6.34,16.885)
CON2_GP_D_N3: P1.K11 X3.10 | length 14.3
  Top Layer w0.1: X3.10@3.27,29.025 3.27,30.23 3.855,30.815 3.897,30.815 3.914,30.832 3.996,30.832 4.138,30.69 4.138,29.862 4.34,29.66 4.34,19.616 4.24,19.516 v1(4.24,19.435)
  Bottom Layer w0.1: P1.K11@3.715,19.435 v1(4.24,19.435)
CON2_GP_D_N4: P1.J13 X3.12 | length 12.1
  Top Layer w0.1: X3.12@0.73,29.025 0.73,29.546 1.315,30.131 1.456,30.131 1.785,29.803 1.785,21.457 1.708,21.38 1.564,21.38 v1(1.507,21.323)
  Bottom Layer w0.1: v1(1.507,21.323) 1.561,21.377 1.748,21.377 1.844,21.473 2.171,21.473 2.179,21.465 2.386,21.465 2.445,21.524 P1.J13@2.445,21.975
CON2_GP_D_N5: P1.K14 X3.14 | length 15.1
  Top Layer w0.1: X3.14@-1.81,29.025 -1.81,30.23 -1.225,30.815 -1.027,30.815 -0.963,30.752 -0.963,26.414 -0.775,26.226 -0.775,24.316 -0.875,24.216 v1(-0.875,24.135)
  Bottom Layer w0.1: v1(-0.875,24.135) -0.794,24.135 -0.67,24.011 1.464,24.011 1.93,23.545 1.93,22.863 2.059,22.735 3.656,22.735 3.715,22.794 P1.K14@3.715,23.245
CON2_GP_D_N6: P1.J16 X3.16 | length 14
  Top Layer w0.1: X3.16@-4.35,29.025 -4.35,30.19 -3.765,30.775 -3.624,30.775 -3.442,30.593 -3.442,26.736 -3.58,26.598 v1(-3.58,26.527)
  Bottom Layer w0.1: v1(-3.58,26.527) -3.536,26.571 0.138,26.571 0.625,26.083 0.625,25.487 0.625,25.375 0.725,25.275 2.386,25.275 2.445,25.334 P1.J16@2.445,25.785